# Altium PCB PCB.PcbDoc (part 5 of 7)
Units mm, origin at the board's own origin, x right, y up, seen from the top; angles counter-clockwise.
Board outline 78.8 x 69 mm, 12 copper layers (Top Layer, GND_12, uStrip1, GND_35, Clocks, GND_57, POWER, Slow_Ctrl, GND_810, uStrip2, GND_1012, Bottom Layer), stack 2.926 mm thick; 290 components, 212 nets, 1379 pads, 3418 vias.
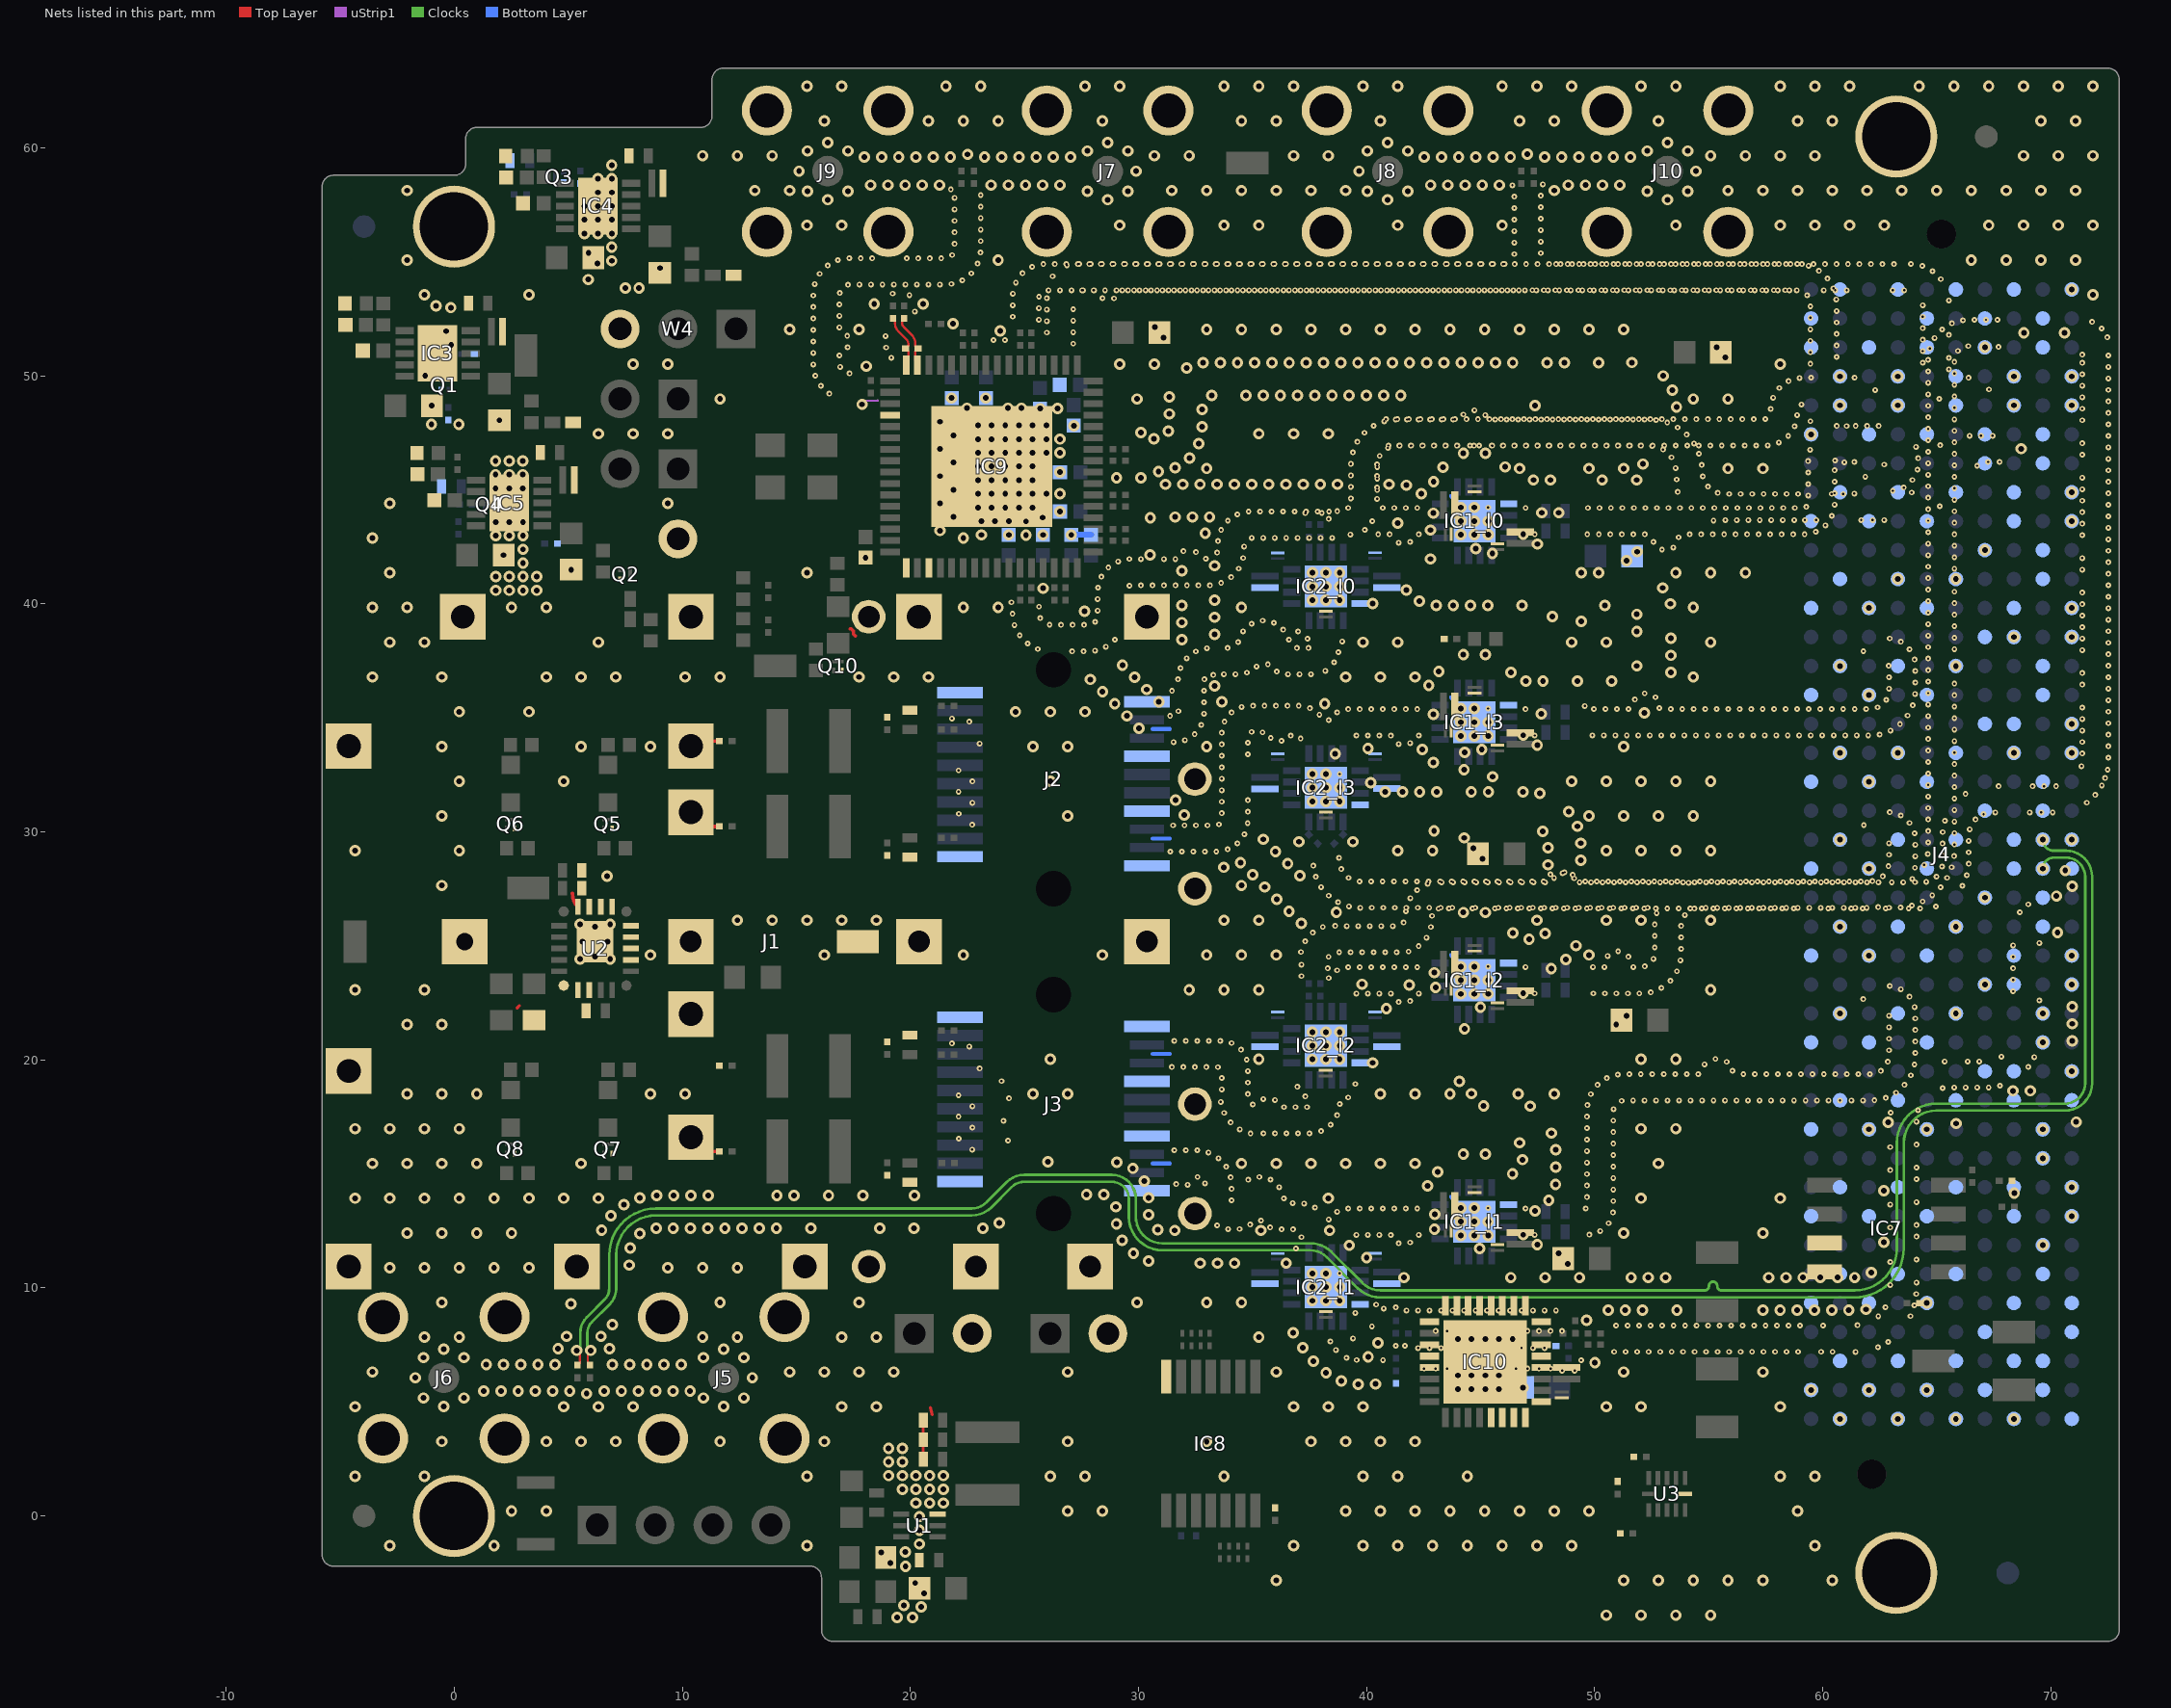
[diagram p14: the nets of this part, all layers, seen from the top]

## Via types
v1: diameter 0.25, hole 0.1, Top Layer to uStrip1, tented both sides, 895 vias
v2: diameter 0.25, hole 0.1, uStrip2 to Bottom Layer, tented both sides, 888 vias
v3: diameter 0.5, hole 0.25, Top Layer to Bottom Layer, tented both sides, 768 vias
v4: diameter 0.5, hole 0.25, Top Layer to Bottom Layer, 545 vias
v5: diameter 0.5, hole 0.25, uStrip1 to uStrip2, tented both sides, 315 vias
v6: diameter 0.584, hole 0.483, Top Layer to Bottom Layer, tented both sides, 6 vias
v7: diameter 0.5, hole 0.25, uStrip1 to uStrip2, 1 vias

## Nets (pads, with @x,y where several pads share a name; then routed paths per layer and width w, separated by ;. In a path a pad name is that pad's centre, name@x,y a point inside that pad or via, vN(x,y) a via of type N, cw(c..) or ccw(c..) an arc to the next point about the centre after c; other vN are vias at no path point) (continued)
GND: C1_l0.1 C1_l1.1 C1_l2.1 C1_l3.1 C2_l0.1 C2_l1.1 C2_l2.1 C2_l3.1 C3_l0.1 C3_l1.1 C3_l2.1 C3_l3.1 C4_l0.1 C4_l1.1 C4_l2.1 C4_l3.1 C5_l0.1 C5_l1.1 C5_l2.1 C5_l3.1 C6_l0.1 C6_l1.1 C6_l2.1 C6_l3.1 C7_l0.1 C7_l1.1 C7_l2.1 C7_l3.1 C8_l0.1 C8_l1.1 C8_l2.1 C8_l3.1 C9_l0.1 C9_l1.1 C9_l2.1 C9_l3.1 C12_l0.1 C12_l1.1 C12_l2.1 C12_l3.1 C13_l0.1 C13_l1.1 C13_l2.1 C13_l3.1 C14.1 C15.1 C16.1 C17.1 C18.1 C19.1 C20.1 C21.2 C23.2 C24.1 C25.1 C26.1 C27.1 C28.1 C30.1 C31.1 C32.1 C33.1 C34.1 C35.1 C36.1 C37.1 C38.1 C39.1 C40.1 C41.1 C42.1 C43.2 C44.2 C45.1 C46.1 C47.1 C48.1 C49.1 C50.1 C51.1 C52.1 C53.1 C54.1 C55.1 C56.1 C65.1 C66.1 C87.1 C88.1 C89.1 C90.1 C93.1 C94.1 C95.1 C96.1 C97.1 C98.1 C99.1 C100.1 C101.1 C102.1 C103.1 C104.1 C105.1 C106.1 C107.1 D1.1 D2.1 IC1_l0.9 IC1_l0.17 IC1_l1.9 IC1_l1.17 IC1_l2.9 IC1_l2.17 IC1_l3.9 IC1_l3.17 IC2_l0.16 IC2_l0.17 IC2_l1.16 IC2_l1.17 IC2_l2.16 IC2_l2.17 IC2_l3.16 IC2_l3.17 IC3.11 IC4.11 IC5.11 IC7.3 IC7.4 IC8.7 IC9.4 IC9.17 IC9.19 IC9.65 IC10.1 IC10.4 IC10.5 IC10.6 IC10.8 IC10.9 IC10.10 IC10.11 IC10.12 IC10.13 IC10.14 IC10.15 IC10.16 IC10.17 IC10.19 IC10.20 IC10.21 IC10.29 IC10.30 IC10.31 IC10.32 IC10.33 J1.1 J1.2 J1.3 J1.4 J1.5 J1.6 J1.7 J1.8 J1.9 J1.10 J1.11 J1.12 J1.13 J1.14 J1.15 J1.16 J1.17 J1.18 J1.19 J1.20 J1.21 J1.22 J1.23 J1.24 J1.25 J1.26 J1.27 J1.28 J1.29 J1.30 J1.31 J1.32 J1.33 J1.34 J1.35 J1.36 J1.37 J2.1 J2.10 J2.11 J2.14 J2.17 J2.20 J3.1 J3.10 J3.11 J3.14 J3.17 J3.20 J4.A1 J4.A4 J4.A5 J4.A8 J4.A9 J4.A12 J4.A13 J4.A16 J4.A17 J4.A20 J4.A21 J4.A24 J4.A25 J4.A28 J4.A29 J4.A32 J4.A33 J4.A36 J4.A37 J4.A40 J4.B2 J4.B3 J4.B6 J4.B7 J4.B10 J4.B11 J4.B14 J4.B15 J4.B18 J4.B19 J4.B22 J4.B23 J4.B26 J4.B27 J4.B30 J4.B31 J4.B34 J4.B35 J4.B38 J4.B39 J4.C1 J4.C4 J4.C5 J4.C8 J4.C9 J4.C12 J4.C13 J4.C16 J4.C17 J4.C20 J4.C21 J4.C24 J4.C25 J4.C28 J4.C29 J4.C32 J4.C33 J4.C36 J4.C38 J4.C40 J4.D2 J4.D3 J4.D6 J4.D7 J4.D10 J4.D13 J4.D16 J4.D19 J4.D22 J4.D25 J4.D28 J4.D37 J4.D39 J4.E1 J4.E4 J4.E5 J4.E8 J4.E11 J4.E14 J4.E17 J4.E20 J4.E23 J4.E26 J4.E29 J4.E32 J4.E35 J4.E38 J4.E40 J4.F2 J4.F3 J4.F6 J4.F9 J4.F12 J4.F15 J4.F18 J4.F21 J4.F24 J4.F27 J4.F30 J4.F33 J4.F36 J4.F39 J4.G1 J4.G4 J4.G5 J4.G8 J4.G11 J4.G14 J4.G17 J4.G20 J4.G23 J4.G26 J4.G29 J4.G32 J4.G35 J4.G38 J4.G40 J4.H3 J4.H6 J4.H9 J4.H12 J4.H15 J4.H18 J4.H21 J4.H24 J4.H27 J4.H30 J4.H33 J4.H36 J4.H39 J4.I1 J4.I4 J4.I5 J4.I8 J4.I11 J4.I14 J4.I17 J4.I20 J4.I23 J4.I26 J4.I29 J4.I32 J4.I35 J4.I38 J4.I40 J4.J2 J4.J3 J4.J6 J4.J9 J4.J12 J4.J15 J4.J18 J4.J21 J4.J24 J4.J27 J4.J30 J4.J33 J4.J36 J4.J39 J5.2 J5.2_1 J5.2_2 J5.2_3 J6.2 J6.2_1 J6.2_2 J6.2_3 J7.2 J7.2_1 J7.2_2 J7.2_3 J8.2 J8.2_1 J8.2_2 J8.2_3 J9.2 J9.2_1 J9.2_2 J9.2_3 J10.2 J10.2_1 J10.2_2 J10.2_3 pad.frame-holes Q1.2 Q2.2 Q3.2 Q4.2 Q5.2 Q6.2 Q7.2 Q8.2 Q10.2 R4.2 R6.1 R10.1 R12.1 R16.1 R19.1 R23.1 R24.2 R27.2 R46.1 R47.1 R65X.1 R66X.1 TP5.1 U1.3 U2.3 U2.4 U2.5 U2.6 U2.8 U2.9 U2.10 U2.11 U2.18 U2.19 U2.20 U2.23 U3.6 W1.2 W2.2 W4.3 W7.1 | length 12.2
  Top Layer w0.102: 2.756,22.261 2.756,22.306
  Top Layer w0.127: 2.756,22.287 2.847,22.378 ; J1.11@10.371,33.765 J1.11@10.598,33.992 ; C23.2@20.56,2.489 C24.1@20.56,3.343 C25.1@20.56,4.197 ; 20.873,4.753 20.958,4.434
  Top Layer w0.152: 5.176,27.308 ccw(c6.015,27.308) 5.197,27.12 ccw(c5.346,27.155) 5.207,27.092 cw(c5.047,27.015) 5.223,27.041 ccw(c5.373,27.064) 5.23,27.013 ccw(c6.015,27.308) 5.373,26.768 U2.11@5.422,26.715 ; J1.7@10.598,15.99 C56.1@11.628,15.99 ; J1.10@10.598,30.238 C50.1@11.628,30.238 ; J1.11@10.598,33.992 C47.1@11.628,33.992 ; 17.368,38.906 17.395,38.906 17.499,38.802 17.499,38.676 17.588,38.588
  uStrip1 w0.102: v3(17.881,48.754) v3@17.957,48.83 ; v3@17.964,48.912 18.553,48.918
  Bottom Layer w0.102: 43.676,14.032 ccw(c43.828,14.032) 43.713,13.931 43.791,13.843 ; 43.676,24.622 ccw(c43.828,24.622) 43.713,24.521 43.791,24.433 ; 43.676,35.936 ccw(c43.828,35.936) 43.713,35.835 43.791,35.747 ; 43.677,44.759 ccw(c43.829,44.759) 43.715,44.658 43.792,44.57
  Bottom Layer w0.178: 30.626,15.465 31.377,15.465 ; 30.626,20.265 31.377,20.265 ; 30.626,29.715 31.377,29.715 ; 30.626,34.515 31.377,34.515
  Bottom Layer w0.254: C88.1@27.053,43.03 C100.1@27.92,43.03
  other v1: 49.765,12.339 50.244,12.496 50.611,12.842 50.798,13.31 49.61,13.487 50.818,13.813 49.661,13.989 50.818,14.317 49.661,14.493 50.818,14.821 49.661,14.997 50.818,15.325 49.661,15.501 50.818,15.829 49.661,16.005 22.705,16.069 50.818,16.333 24.278,16.465 49.661,16.509 22.118,16.551 50.818,16.837 49.661,17.013 22.714,17.033 24.078,17.328 50.818,17.341 22.109,17.515 49.661,17.517 50.83,17.845 22.714,17.969 49.682,18.02 51.181,18.207 51.685,18.221 52.189,18.221 52.693,18.221 53.197,18.221 53.701,18.221 54.205,18.221 54.709,18.221 55.213,18.221 55.717,18.221 56.221,18.221 56.725,18.221 57.229,18.221 57.733,18.221 58.237,18.221 58.741,18.221 59.245,18.221 59.749,18.221 60.253,18.221 60.757,18.221 61.261,18.221 61.765,18.221 62.269,18.232 24.32,18.316 62.761,18.338 22.109,18.452 49.83,18.502 63.211,18.565 50.125,18.911 63.583,18.906 23.994,19.073 50.533,19.207 63.86,19.327 51.014,19.356 51.518,19.378 52.022,19.378 52.526,19.378 53.03,19.378 53.534,19.378 54.038,19.378 54.542,19.378 56.522,19.378 57.026,19.378 57.53,19.378 58.034,19.378 58.538,19.378 59.042,19.378 59.546,19.378 60.05,19.378 60.554,19.378 61.058,19.378 61.562,19.378 62.066,19.378 56.04,19.526 62.548,19.524 23.035,19.63 54.814,19.81 64.022,19.804 55.789,19.919 62.853,19.925 55.297,20.044 64.06,20.307 62.903,20.427 22.577,20.589 21.82,20.727 64.06,20.811 62.903,20.931 64.06,21.315 62.903,21.435 64.06,21.819 62.903,21.939 64.025,22.321 61.778,22.67 63.803,22.774 49.942,22.919 50.446,22.919 50.95,22.919 51.454,22.919 51.958,22.919 52.46,22.967 63.423,23.104 52.926,23.159 62.939,23.247 53.32,23.474 53.604,23.89 49.924,24.076 50.428,24.076 51.692,24.076 52.195,24.103 53.76,24.369 52.574,24.436 51.476,24.531 50.569,24.56 51.029,24.765 53.789,24.872 52.633,24.937 53.789,25.376 52.633,25.441 53.79,25.88 52.633,25.945 53.955,26.357 52.717,26.442 54.37,26.643 39.723,26.674 54.873,26.672 55.377,26.672 55.881,26.672 56.385,26.672 56.889,26.672 57.393,26.672 57.897,26.672 58.401,26.672 58.905,26.672 59.409,26.672 59.913,26.672 60.417,26.672 60.921,26.672 61.425,26.672 61.929,26.672 40.227,26.678 40.731,26.678 41.235,26.678 41.739,26.678 42.243,26.678 42.747,26.678 43.251,26.678 43.755,26.678 44.763,26.678 45.771,26.678 46.275,26.678 46.779,26.678 47.283,26.678 47.787,26.678 48.291,26.678 48.795,26.678 49.299,26.678 49.803,26.678 50.307,26.678 50.811,26.678 51.315,26.678 51.819,26.678 52.323,26.678 62.907,26.678 63.411,26.687 62.432,26.705 39.223,26.74 63.908,26.772 38.753,26.921 64.378,26.953 38.338,27.207 64.803,27.224 38.003,27.584 65.166,27.574 54.115,27.773 39.691,27.832 40.195,27.827 40.699,27.827 41.203,27.827 41.707,27.827 42.211,27.827 42.715,27.827 43.219,27.827 43.723,27.827 44.227,27.827 44.731,27.827 45.235,27.827 45.739,27.827 46.243,27.827 46.747,27.827 47.251,27.827 47.755,27.827 49.588,27.827 50.092,27.827 50.596,27.827 51.1,27.827 51.604,27.827 52.108,27.827 52.612,27.827 53.116,27.827 53.62,27.827 54.616,27.829 55.12,27.829 55.624,27.829 56.128,27.829 56.632,27.829 57.136,27.829 57.64,27.829 58.144,27.829 58.648,27.829 59.152,27.829 59.656,27.829 60.16,27.829 60.664,27.829 61.168,27.829 61.672,27.829 62.176,27.845 63.925,27.941 49.104,27.967 39.211,27.987 65.453,27.988 37.773,28.032 62.633,28.057 48.063,28.143 48.676,28.233 38.885,28.37 64.042,28.431 65.652,28.451 62.879,28.497 37.66,28.523 64.448,28.555 38.792,28.866 64.06,28.935 65.755,28.945 62.903,29 64.604,29.034 64.06,29.439 65.773,29.448 62.903,29.504 64.624,29.538 64.025,29.941 65.773,29.952 64.624,30.042 61.803,30.301 22.705,30.317 63.803,30.394 65.773,30.456 64.624,30.546 63.423,30.724 22.119,30.799 62.939,30.867 65.773,30.96 64.624,31.05 22.714,31.281 65.773,31.464 64.624,31.554 22.109,31.763 65.773,31.968 64.624,32.058 22.714,32.217 65.773,32.472 64.624,32.562 22.109,32.699 65.773,32.976 64.624,33.066 65.773,33.48 64.624,33.57 23.035,33.878 65.773,33.984 64.624,34.074 49.897,34.233 50.401,34.233 50.905,34.233 51.409,34.233 51.913,34.233 52.417,34.233 52.921,34.233 53.425,34.233 53.929,34.233 54.433,34.233 54.937,34.233 55.441,34.233 55.945,34.233 56.449,34.233 56.953,34.233 57.457,34.233 57.961,34.233 58.465,34.233 58.969,34.233 59.473,34.233 59.977,34.233 60.481,34.233 60.985,34.233 61.489,34.233 61.993,34.233 62.495,34.275 62.969,34.448 65.773,34.488 64.624,34.578 63.387,34.729 22.577,34.836 21.82,34.975 65.773,34.992 64.624,35.082 63.721,35.106 49.97,35.39 50.474,35.39 50.978,35.39 51.482,35.39 53.335,35.39 53.839,35.39 54.343,35.39 54.847,35.39 55.351,35.39 55.855,35.39 56.359,35.39 56.863,35.39 57.367,35.39 57.871,35.39 58.375,35.39 58.879,35.39 59.383,35.39 59.887,35.39 60.391,35.39 60.895,35.39 61.399,35.39 61.903,35.39 52.833,35.433 62.402,35.464 65.773,35.496 49.568,35.526 63.946,35.557 64.624,35.586 62.784,35.792 51.765,35.806 52.663,35.908 65.773,36 64.049,36.051 52.189,36.079 64.624,36.09 62.903,36.282 65.773,36.504 64.06,36.555 64.624,36.594 62.903,36.786 64.06,37.059 64.624,37.098 62.892,37.29 64.025,37.561 64.624,37.602 27.087,37.924 27.591,37.924 61.78,37.926 28.094,37.952 25.585,38.022 63.803,38.014 65.773,38.016 28.569,38.121 64.624,38.106 25.142,38.264 63.423,38.344 28.963,38.435 62.939,38.487 65.773,38.52 64.624,38.61 24.791,38.624 65.773,39.024 24.561,39.073 26.101,39.09 26.605,39.08 27.109,39.08 27.613,39.08 64.624,39.114 28.099,39.216 25.69,39.381 65.773,39.528 24.476,39.57 64.624,39.618 28.209,39.708 25.637,39.882 65.773,40.032 24.426,40.071 64.624,40.122 28.209,40.212 65.773,40.536 64.624,40.626 28.225,40.716 29.603,40.802 30.107,40.813 30.611,40.813 31.115,40.813 31.619,40.813 32.123,40.813 32.627,40.813 33.131,40.813 33.623,40.922 64.624,41.13 34.059,41.176 28.37,41.198 34.395,41.551 65.773,41.544 28.678,41.597 64.624,41.634 29.107,41.861 29.599,41.972 30.103,41.97 31.111,41.97 31.615,41.97 32.949,41.983 34.591,42.015 65.773,42.048 64.624,42.138 33.446,42.255 32.517,42.275 31.972,42.312 52.95,42.384 53.445,42.477 34.632,42.518 65.773,42.552 64.624,42.642 52.575,42.721 33.486,42.757 34.962,42.899 35.466,42.899 35.97,42.899 36.474,42.899 36.978,42.899 37.482,42.899 37.986,42.899 38.49,42.899 53.678,42.924 49.678,43.056 50.182,43.056 50.686,43.056 51.19,43.056 51.694,43.056 52.198,43.056 54.165,43.056 54.669,43.056 55.173,43.056 55.677,43.056 56.181,43.056 56.685,43.056 57.189,43.056 57.693,43.056 58.197,43.056 58.701,43.056 59.205,43.055 65.773,43.056 64.624,43.146 59.696,43.169 33.622,43.242 39.923,43.251 60.116,43.447 65.773,43.56 40.252,43.632 33.916,43.652 64.624,43.65 60.4,43.863 34.337,43.929 34.826,44.051 35.33,44.055 35.834,44.055 36.338,44.055 36.842,44.055 37.346,44.055 37.85,44.055 38.354,44.055 65.773,44.064 64.624,44.154 49.703,44.213 50.207,44.213 50.711,44.213 51.215,44.213 51.719,44.213 52.223,44.213 52.727,44.213 53.231,44.213 53.735,44.213 54.239,44.213 54.743,44.213 55.247,44.213 55.751,44.213 56.255,44.213 56.759,44.213 57.263,44.213 57.767,44.213 58.271,44.213 58.775,44.213 59.277,44.258 60.52,44.353 65.773,44.568 40.46,44.607 39.304,44.625 64.624,44.658 59.363,44.754 60.52,44.857 63.07,44.963 65.773,45.072 40.46,45.111 63.553,45.105 39.304,45.129 64.624,45.162 59.363,45.258 60.52,45.361 63.933,45.437 61.864,45.578 65.773,45.576 40.46,45.615 39.304,45.633 64.624,45.666 59.363,45.762 60.52,45.865 64.151,45.891 65.773,46.08 40.46,46.119 62.697,46.113 39.304,46.137 64.624,46.17 60.945,46.215 61.384,46.231 59.358,46.266 60.542,46.292 64.185,46.394 65.773,46.584 64.624,46.674 59.448,46.762 64.086,46.888 40.955,46.949 41.459,46.949 41.963,46.949 42.467,46.949 42.971,46.949 43.475,46.949 43.979,46.949 44.534,46.949 44.936,46.949 45.491,46.949 45.995,46.949 46.499,46.949 47.003,46.949 47.507,46.949 48.011,46.949 48.515,46.949 49.019,46.949 49.523,46.949 50.027,46.949 50.531,46.949 51.035,46.949 51.539,46.949 52.043,46.949 52.547,46.949 53.051,46.949 53.555,46.949 54.059,46.949 54.563,46.949 55.067,46.949 55.571,46.949 56.075,46.949 56.579,46.949 57.083,46.949 57.587,46.953 58.075,47.08 65.773,47.088 64.624,47.178 58.487,47.369 65.773,47.592 64.624,47.682 58.762,47.792 61.044,47.802 61.444,47.805 61.948,47.805 62.452,47.805 60.612,47.808 59.459,48.013 40.85,48.106 41.354,48.106 41.858,48.106 42.362,48.106 42.866,48.106 43.37,48.106 43.874,48.106 44.378,48.106 44.882,48.106 45.386,48.106 45.89,48.106 46.394,48.106 46.898,48.106 47.402,48.106 47.906,48.106 48.41,48.106 48.914,48.106 49.418,48.106 49.922,48.106 50.426,48.106 50.93,48.106 51.434,48.106 51.938,48.106 52.442,48.106 52.946,48.106 53.45,48.106 53.954,48.106 54.458,48.106 54.962,48.106 55.466,48.106 55.97,48.106 56.474,48.106 56.978,48.106 57.482,48.108 65.773,48.096 64.624,48.186 58.878,48.282 57.718,48.553 65.773,48.6 64.624,48.69 59.066,48.75 57.829,49.045 65.773,49.104 64.624,49.194 16.441,49.221 62.3,49.383 58.095,49.473 16.074,49.566 65.773,49.608 64.624,49.698 58.5,49.773 58.984,49.912 59.488,49.923 61.395,49.928 15.831,50.008 17.332,50.109 65.773,50.112 64.624,50.202 16.919,50.397 15.738,50.503 59.459,50.533 65.773,50.616 64.618,50.706 19.164,50.797 60.608,50.832 16.889,50.9 15.74,51.007 59.459,51.037 65.924,51.097 64.689,51.204 17.247,51.255 18.935,51.246 67.709,51.273 66.381,51.308 60.608,51.336 27.137,51.416 15.74,51.511 59.459,51.541 23.638,51.572 24.142,51.572 64.901,51.662 17.231,51.759 18.906,51.749 60.608,51.84 25.98,51.901 27.137,51.92 15.74,52.015 59.459,52.045 65.235,52.039 16.889,52.129 65.663,52.306 60.608,52.344 25.98,52.405 27.137,52.424 66.148,52.441 66.652,52.459 67.156,52.459 67.66,52.459 15.74,52.519 59.459,52.549 16.889,52.633 20.188,52.828 60.608,52.848 25.98,52.909 27.137,52.928 15.74,53.023 59.459,53.053 16.889,53.137 60.594,53.352 25.98,53.413 15.74,53.527 19.954,53.541 59.315,53.536 19.219,53.611 16.902,53.641 27.524,53.755 28.028,53.755 28.532,53.755 29.036,53.755 29.54,53.755 30.044,53.755 30.548,53.755 31.052,53.755 31.556,53.755 32.06,53.755 32.564,53.755 33.068,53.755 33.572,53.755 34.076,53.755 34.58,53.755 35.084,53.755 35.588,53.755 36.092,53.755 36.596,53.755 37.1,53.755 37.604,53.755 38.108,53.755 38.612,53.755 39.116,53.755 39.62,53.755 40.124,53.755 40.628,53.755 41.132,53.755 41.636,53.755 42.14,53.755 42.644,53.755 43.148,53.755 43.652,53.755 44.156,53.755 44.66,53.755 45.164,53.755 45.668,53.755 46.172,53.755 46.676,53.755 47.269,53.759 47.773,53.759 48.277,53.759 48.781,53.759 49.285,53.759 49.789,53.759 50.293,53.759 50.797,53.759 51.301,53.759 51.805,53.759 52.309,53.759 52.813,53.759 53.317,53.759 53.821,53.759 54.325,53.759 54.829,53.759 55.333,53.759 55.837,53.759 56.341,53.759 56.845,53.759 57.349,53.759 57.853,53.759 58.357,53.759 58.861,53.755 60.466,53.84 17.259,53.996 15.8,54.027 17.763,54.009 18.267,54.009 18.771,54.009 19.275,54.009 19.779,54.009 20.283,54.009 20.787,54.009 21.291,54.009 21.794,54.033 22.273,54.191 60.205,54.271 26.231,54.371 16.023,54.48 22.671,54.501 59.833,54.611 16.374,54.841 59.38,54.832 26.863,54.847 27.397,54.912 27.901,54.912 28.405,54.912 28.909,54.912 29.413,54.912 29.917,54.912 30.421,54.912 30.925,54.912 31.429,54.912 31.933,54.912 32.437,54.912 32.941,54.912 33.445,54.912 33.949,54.912 34.453,54.912 34.957,54.912 35.461,54.912 35.965,54.912 36.469,54.912 36.973,54.912 37.477,54.912 37.981,54.912 38.485,54.912 38.989,54.912 39.493,54.912 39.997,54.912 40.501,54.912 41.005,54.912 41.509,54.912 42.013,54.912 42.517,54.912 43.021,54.912 43.525,54.912 44.029,54.912 44.533,54.912 45.037,54.912 45.541,54.912 46.045,54.912 48.309,54.907 48.813,54.907 49.317,54.907 49.821,54.907 50.325,54.907 50.829,54.907 51.333,54.907 51.837,54.907 52.341,54.907 52.845,54.907 53.349,54.907 53.853,54.907 54.357,54.907 54.861,54.907 55.365,54.907 55.869,54.907 56.373,54.907 56.877,54.907 57.381,54.907 57.885,54.907 58.389,54.907 58.882,54.911 22.944,54.924 16.819,55.078 17.315,55.164 17.819,55.157 18.323,55.157 19.835,55.157 20.339,55.157 20.843,55.157 21.347,55.157 21.831,55.301 46.479,55.345 47.635,55.387 23.072,55.412 21.933,55.794 46.479,55.849 47.635,55.891 23.081,55.916 21.933,56.298 46.479,56.353 47.635,56.395 23.081,56.42 21.933,56.802 46.479,56.857 47.635,56.899 23.081,56.924 21.933,57.306 46.479,57.361 47.635,57.403 23.081,57.428 21.933,57.81 46.479,57.865 47.635,57.907 23.081,57.932 21.769,58.178 46.395,58.362 47.728,58.402
  other v2: 48.576,6.373 49.122,6.371 42.521,6.465 43.025,6.465 43.529,6.465 46.553,6.465 47.057,6.465 47.561,6.465 48.065,6.465 40.72,6.835 49.409,6.83 39.565,6.841 39.117,6.937 50.854,7.202 51.358,7.202 51.862,7.202 52.366,7.202 52.87,7.202 53.374,7.202 53.878,7.202 54.382,7.202 54.886,7.202 55.39,7.202 55.894,7.202 56.398,7.202 56.902,7.202 57.406,7.202 57.91,7.202 58.414,7.202 58.918,7.202 59.926,7.202 60.43,7.202 61.438,7.198 38.655,7.278 42.255,7.364 42.759,7.364 43.263,7.364 46.791,7.364 47.295,7.364 47.799,7.364 62.42,7.403 41.282,7.464 41.679,7.464 62.868,7.635 38.414,7.652 39.403,7.787 43.025,8.113 43.529,8.113 47.057,8.113 47.561,8.113 48.065,8.113 48.569,8.113 40.234,8.315 50.94,8.351 51.444,8.351 51.948,8.351 52.452,8.351 52.956,8.351 53.46,8.351 53.964,8.351 54.468,8.351 54.972,8.351 55.476,8.351 55.98,8.351 56.484,8.351 56.988,8.351 57.492,8.351 57.996,8.351 58.5,8.351 59.004,8.351 60.012,8.351 61.524,8.366 62.435,8.762 63.847,8.764 39.506,8.909 41.751,9.012 42.255,9.012 42.759,9.012 43.263,9.012 43.767,9.012 44.271,9.012 44.775,9.012 45.279,9.012 45.783,9.012 46.287,9.012 46.791,9.012 47.295,9.012 47.799,9.012 48.303,9.012 40.751,9.096 41.282,9.151 62.749,9.157 64.018,9.239 40.419,9.271 64.098,9.736 62.959,10.131 64.108,10.24 38.818,10.639 62.959,11.139 64.108,11.248 36.9,11.73 41.405,11.957 41.908,11.996 37.143,12.23 64.108,12.256 39.55,12.328 40.054,12.328 40.558,12.328 41.062,12.326 42.286,12.328 47.372,12.328 36.271,12.573 36.775,12.573 33.927,12.583 34.431,12.589 62.959,12.651 35.774,12.658 33.449,12.744 64.108,12.76 34.896,12.784 35.369,12.958 38.337,13.006 38.71,13.345 39.195,13.484 39.699,13.485 40.203,13.485 40.707,13.485 41.211,13.485 41.715,13.485 42.219,13.485 46.97,13.485 45.328,13.507 37.735,13.528 62.959,13.659 37.262,13.704 36.759,13.722 64.108,13.768 34.079,13.844 36.372,13.93 34.079,14.348 36.167,14.422 32.155,14.527 31.652,14.558 32.912,14.59 34.809,14.745 35.789,14.755 64.108,14.776 34.041,14.851 32.586,14.871 35.298,14.869 62.959,15.171 64.108,15.28 33.846,15.315 33.507,15.689 33.07,15.94 31.569,16.039 32.073,16.039 32.577,16.043 62.959,16.179 64.108,16.288 34.911,16.774 35.479,16.782 35.983,16.782 36.487,16.782 36.991,16.782 37.495,16.781 38.006,16.879 34.439,16.953 38.425,17.159 34.041,17.261 64.108,17.296 38.706,17.577 33.756,17.677 62.982,17.69 64.181,17.795 36.376,17.931 36.88,17.931 37.384,17.931 35.011,18.051 38.822,18.068 33.605,18.158 35.982,18.245 35.473,18.286 39.195,18.355 37.311,18.404 34.794,18.505 33.645,18.706 65.258,18.765 65.761,18.793 66.265,18.793 66.769,18.793 67.273,18.795 36.964,18.825 67.771,18.873 39.505,18.947 34.794,19.009 33.645,19.21 34.794,19.513 33.476,19.685 31.46,19.691 31.964,19.691 32.468,19.691 32.972,19.691 69.011,19.696 65.349,19.933 66.357,19.933 66.861,19.933 34.742,20.015 69.275,20.125 67.834,20.148 34.492,20.452 34.079,20.742 31.569,20.839 32.073,20.839 32.577,20.839 33.081,20.839 33.585,20.839 41.405,22.543 41.908,22.582 69.496,22.614 39.55,22.915 40.054,22.915 40.558,22.915 41.062,22.913 42.286,22.915 47.372,22.918 68.347,23.012 68.347,23.516 38.337,23.592 37.146,23.679 38.71,23.931 38.295,24.022 68.347,24.02 39.195,24.071 39.699,24.072 40.203,24.072 40.707,24.072 41.211,24.072 41.715,24.072 42.219,24.072 46.97,24.075 45.328,24.097 37.146,24.183 38.333,24.525 68.347,24.524 37.127,24.734 38.796,24.724 39.3,24.724 39.804,24.724 40.308,24.724 40.812,24.724 41.316,24.724 41.839,24.756 42.283,24.996 68.347,25.028 69.496,25.134 37.308,25.205 42.626,25.365 37.642,25.582 38.08,25.831 42.816,25.832 38.625,25.877 39.129,25.872 39.633,25.872 40.137,25.872 40.641,25.872 41.145,25.872 41.625,26.026 42.87,26.319 68.644,26.478 41.721,26.52 43.151,26.635 43.607,26.644 44.647,26.645 45.623,26.644 46.127,26.644 46.631,26.644 47.135,26.644 47.639,26.644 48.143,26.644 48.647,26.644 49.151,26.644 49.655,26.644 50.159,26.644 50.663,26.644 51.167,26.644 51.671,26.644 52.175,26.644 52.679,26.644 53.183,26.644 53.687,26.644 54.191,26.644 54.695,26.644 55.199,26.644 55.703,26.644 56.207,26.644 56.711,26.644 57.215,26.644 57.719,26.644 58.223,26.644 58.727,26.644 60.239,26.644 61.247,26.644 61.751,26.644 62.759,26.644 63.767,26.644 64.271,26.644 64.961,26.729 69.01,26.825 41.919,27.098 42.217,27.449 66.125,27.642 42.677,27.729 43.29,27.792 43.794,27.792 44.298,27.792 44.802,27.792 45.306,27.792 45.81,27.792 46.314,27.792 46.818,27.792 47.322,27.792 47.826,27.792 49.338,27.792 49.842,27.792 50.346,27.792 50.85,27.792 51.354,27.792 51.858,27.792 52.362,27.792 52.866,27.792 53.37,27.792 53.874,27.792 54.378,27.792 54.882,27.792 55.386,27.792 55.89,27.792 56.394,27.792 56.898,27.792 57.402,27.792 57.906,27.792 58.41,27.792 58.914,27.792 59.418,27.792 59.922,27.792 60.426,27.792 60.93,27.792 61.434,27.792 61.938,27.792 62.442,27.792 63.027,27.792 63.531,27.792 64.048,27.797 64.539,27.813 48.219,27.98 64.99,28.038 49.036,28.118 66.32,28.106 48.596,28.194 65.227,28.483 66.4,28.604 65.25,28.986 66.399,29.108 33.412,29.137 31.396,29.141 31.9,29.141 32.404,29.141 32.908,29.141 33.906,29.239 65.25,29.49 34.337,29.5 66.399,29.612 34.643,29.9 65.26,29.994 66.444,30.114 31.511,30.289 32.015,30.289 32.519,30.289 33.023,30.289 33.526,30.333 34.782,30.385 65.358,30.488 66.699,30.549 67.054,30.783 33.645,30.823 67.563,30.858 69.075,30.858 69.579,30.858 70.083,30.858 34.794,30.889 71.577,31.285 33.645,31.327 34.794,31.393 71.949,31.624 66.261,31.667 33.645,31.831 67.713,32.007 69.198,32.007 69.702,32.007 70.233,32.007 72.239,32.037 33.645,32.335 72.381,32.367 38.818,32.54 72.491,32.729 33.645,32.839 71.344,32.883 72.525,33.258 33.645,33.343 34.794,33.409 71.376,33.442 72.525,33.762 33.645,33.847 41.407,33.857 34.794,33.913 41.909,33.897 31.533,33.941 71.376,33.946 36.265,33.998 32.03,34.025 37.107,34.1 35.799,34.123 36.675,34.223 39.55,34.229 40.054,34.229 40.558,34.229 41.064,34.227 42.288,34.229 47.372,34.232 72.525,34.266 32.461,34.285 33.645,34.351 35.438,34.367 34.96,34.388 71.376,34.45 32.753,34.696 72.525,34.77 33.771,34.839 38.337,34.906 71.376,34.954 31.384,35.089 37.93,35.142 32.874,35.185 34.079,35.237 38.71,35.245 72.525,35.274 31.744,35.297 39.195,35.385 39.699,35.386 40.203,35.386 40.707,35.386 41.211,35.386 41.715,35.386 42.219,35.386 45.328,35.411 46.97,35.389 37.514,35.426 71.376,35.458 34.519,35.484 35.02,35.537 35.524,35.537 36.028,35.537 36.532,35.537 37.022,35.537 32.873,35.689 72.525,35.778 31.467,36.187 32.873,36.193 72.525,36.282 71.376,36.466 31.729,36.698 32.89,36.697 72.525,36.786 33.279,36.886 33.746,36.921 34.25,36.921 36.554,36.92 37.058,36.921 37.562,36.921 34.75,36.985 71.376,36.97 36.063,37.032 38.191,37.067 31.842,37.189 35.175,37.256 72.525,37.29 35.67,37.348 38.577,37.441 32.111,37.615 72.525,37.794 38.76,37.887 32.515,37.916 71.376,37.978 32.999,38.058 33.908,38.069 36.945,38.069 37.449,38.069 72.525,38.298 34.365,38.33 38.928,38.357 36.595,38.433 37.411,38.477 71.376,38.482 34.581,38.797 37,38.792 72.525,38.802 36.34,38.871 71.376,38.986 34.956,39.133 35.936,39.173 35.441,39.27 72.525,39.306 71.376,39.49 72.525,39.81 71.376,39.994 72.525,40.314 71.376,40.498 72.525,40.818 72.525,41.322 71.376,41.506 72.525,41.826 71.376,42.01 72.525,42.33 41.407,42.684 41.909,42.723 72.525,42.834 71.376,43.018 39.288,43.044 40.509,43.055 41.013,43.053 42.288,43.055 47.373,43.055 72.525,43.338 71.376,43.522 55.213,43.659 55.727,43.677 56.231,43.677 56.735,43.677 57.239,43.677 57.743,43.677 58.247,43.677 58.751,43.677 59.214,43.677 59.718,43.677 61.684,43.677 62.188,43.677 62.692,43.677 38.339,43.733 72.525,43.842 37.315,43.984 38.036,43.99 71.376,44.026 38.712,44.072 39.196,44.211 40.708,44.212 41.212,44.212 41.716,44.212 42.22,44.212 46.971,44.212 45.329,44.234 65.13,44.284 72.525,44.346 71.376,44.53 39.317,44.636 55.897,44.825 56.401,44.825 56.905,44.825 57.409,44.825 57.913,44.825 58.417,44.825 58.921,44.825 60.394,44.825 60.898,44.825 61.382,44.843 72.525,44.85 55.396,44.873 63.897,44.886 53.644,44.915 40.466,44.993 71.376,45.034 39.317,45.14 54.971,45.145 72.525,45.354 53.596,45.459 40.466,45.497 71.376,45.538 54.745,45.595 39.317,45.644 72.525,45.858 53.55,45.96 40.466,46.001 66.766,46.06 54.696,46.097 39.317,46.148 67.249,46.231 67.753,46.231 72.525,46.362 53.368,46.431 40.573,46.494 71.376,46.546 54.576,46.586 39.399,46.645 52.998,46.773 40.936,46.843 72.525,46.866 41.431,46.94 41.935,46.94 42.439,46.94 42.943,46.94 43.447,46.94 43.951,46.94 44.709,46.94 45.513,46.94 45.967,46.94 46.471,46.94 46.975,46.94 47.479,46.94 47.983,46.94 48.487,46.94 48.991,46.94 49.495,46.94 49.999,46.94 50.503,46.94 51.007,46.94 51.511,46.94 52.015,46.94 52.518,46.927 65.153,46.964 54.353,47.039 71.376,47.05 39.598,47.108 72.525,47.37 66.438,47.378 66.942,47.378 67.446,47.378 54.033,47.428 39.906,47.507 53.637,47.74 40.307,47.813 72.525,47.874 53.182,47.956 40.771,48.009 71.376,48.058 52.691,48.069 41.268,48.09 41.772,48.089 42.276,48.089 42.78,48.089 43.284,48.089 43.788,48.089 45.635,48.089 46.139,48.089 46.643,48.089 47.147,48.089 47.651,48.089 48.155,48.089 48.659,48.089 49.163,48.089 49.667,48.089 50.171,48.089 50.675,48.089 51.179,48.089 51.683,48.089 52.187,48.089 45.201,48.281 44.24,48.312 72.525,48.378 44.727,48.495 71.376,48.562 72.525,48.882 65.106,48.998 71.376,49.066 72.525,49.386 67.289,49.409 71.376,49.57 72.525,49.89 66.393,49.919 71.376,50.074 65.53,50.29 72.525,50.394 64.383,50.581 71.376,50.578 65.53,50.794 72.525,50.898 71.378,50.936 64.383,51.085 64.383,51.589 72.474,51.694 65.53,51.802 64.383,52.093 72.225,52.082 71.81,52.368 25.633,52.468 24.484,52.599 64.383,52.597 25.633,52.972 24.484,53.103 64.383,53.101 65.53,53.314 28.422,53.41 28.926,53.399 25.635,53.476 24.492,53.607 26.053,53.757 26.557,53.757 27.061,53.757 27.565,53.757 28.053,53.754 29.284,53.754 29.804,53.757 30.308,53.757 30.812,53.757 31.316,53.757 31.82,53.757 32.324,53.757 32.828,53.757 33.332,53.757 33.836,53.757 34.34,53.757 34.844,53.757 35.348,53.757 35.852,53.757 36.356,53.757 36.86,53.757 37.364,53.757 37.868,53.757 38.372,53.757 38.876,53.757 39.38,53.757 39.884,53.757 40.388,53.757 40.892,53.757 41.396,53.757 41.9,53.757 42.404,53.757 42.908,53.757 43.412,53.757 43.916,53.757 44.42,53.757 44.924,53.757 45.428,53.757 45.932,53.757 46.436,53.757 46.94,53.757 47.444,53.757 47.948,53.757 48.452,53.757 48.956,53.757 49.46,53.757 49.964,53.757 50.468,53.757 50.972,53.757 51.476,53.757 51.98,53.757 52.484,53.757 52.988,53.757 53.492,53.757 53.996,53.757 54.5,53.757 55.004,53.757 55.508,53.757 56.012,53.757 56.516,53.757 57.02,53.757 57.524,53.757 58.028,53.757 58.532,53.757 60.044,53.757 60.548,53.757 61.052,53.757 63.068,53.757 63.572,53.757 24.624,54.094 65.177,54.247 24.915,54.505 64.814,54.597 25.336,54.782 64.365,54.825 25.825,54.903 26.329,54.906 26.833,54.906 27.337,54.906 27.841,54.906 28.345,54.906 28.849,54.906 29.353,54.906 29.857,54.906 30.361,54.906 30.865,54.906 31.369,54.906 31.873,54.906 32.377,54.906 32.881,54.906 33.385,54.906 33.889,54.906 34.393,54.906 34.897,54.906 35.401,54.906 35.905,54.906 36.409,54.906 36.913,54.906 37.417,54.906 37.921,54.906 38.425,54.906 38.929,54.906 39.433,54.906 39.937,54.906 40.441,54.906 40.945,54.906 41.449,54.906 41.953,54.906 42.457,54.906 42.961,54.906 43.465,54.906 43.969,54.906 44.473,54.906 44.977,54.906 45.481,54.906 45.985,54.906 46.489,54.906 46.993,54.906 47.497,54.906 48.001,54.906 48.505,54.906 49.009,54.906 49.513,54.906 50.017,54.906 50.521,54.906 51.025,54.906 51.529,54.906 52.033,54.906 52.537,54.906 53.041,54.906 53.545,54.906 54.049,54.906 54.553,54.906 55.057,54.906 55.561,54.906 56.065,54.906 56.569,54.906 57.073,54.906 57.577,54.906 58.081,54.906 58.585,54.906 59.089,54.906 59.593,54.906 60.097,54.906 60.601,54.906 61.105,54.906 61.609,54.906 62.113,54.906 62.617,54.906 63.121,54.906 63.868,54.909
  other v3: 19.414,-4.457 20.088,-4.457 50.513,-4.351 52.037,-4.351 53.561,-4.351 55.085,-4.351 20.478,-3.986 19.71,-3.924 36.035,-2.827 51.275,-2.827 52.799,-2.827 54.323,-2.827 55.847,-2.827 57.371,-2.827 60.419,-2.827 -2.827,-1.303 1.745,-1.303 15.461,-1.303 36.797,-1.303 39.845,-1.303 41.369,-1.303 42.893,-1.303 44.417,-1.303 45.941,-1.303 47.465,-1.303 48.989,-1.303 59.657,-1.303 2.507,0.221 4.031,0.221 26.891,0.221 28.415,0.221 39.083,0.221 40.607,0.221 42.131,0.221 43.655,0.221 45.179,0.221 46.703,0.221 48.227,0.221 49.751,0.221 58.895,0.221 -4.351,1.745 -1.303,1.745 15.461,1.745 26.129,1.745 27.653,1.745 33.749,1.745 39.845,1.745 41.369,1.745 44.417,1.745 58.133,1.745 59.657,1.745 -0.541,3.269 4.031,3.269 5.555,3.269 7.079,3.269 11.651,3.269 16.223,3.269 26.891,3.269 32.987,3.269 37.559,3.269 39.083,3.269 40.607,3.269 42.131,3.269 60.758,4.26 63.298,4.26 65.838,4.26 68.378,4.26 -4.351,4.793 4.793,4.793 6.317,4.793 7.841,4.793 16.985,4.793 18.509,4.793 36.797,4.793 38.321,4.793 39.845,4.793 50.513,4.793 52.037,4.793 58.133,4.793 5.801,5.366 1.292,5.485 2.046,5.485 2.8,5.485 3.554,5.485 4.308,5.485 5.062,5.485 6.569,5.485 7.323,5.485 8.077,5.485 8.831,5.485 9.585,5.485 10.339,5.485 59.488,5.53 62.028,5.53 64.568,5.53 39.628,5.779 40.386,5.787 38.891,5.925 38.224,6.278 -3.589,6.317 14.699,6.317 16.223,6.317 17.747,6.317 19.271,6.317 26.891,6.317 36.035,6.317 51.275,6.317 57.371,6.317 1.404,6.639 2.158,6.639 2.912,6.639 3.666,6.639 4.42,6.639 6.933,6.639 7.687,6.639 8.441,6.639 9.195,6.639 9.949,6.639 50.013,6.723 37.672,6.791 40.068,6.975 37.203,7.381 40.495,7.597 -1.303,7.841 0.221,7.841 10.889,7.841 12.413,7.841 16.985,7.841 18.509,7.841 35.273,7.841 36.778,8.041 49.645,8.591 64.568,9.34 -0.541,9.365 11.651,9.365 17.747,9.365 29.939,9.365 32.987,9.365 34.511,9.365 -2.827,10.889 -1.303,10.889 0.221,10.889 1.745,10.889 3.269,10.889 9.365,10.889 10.889,10.889 12.413,10.889 69.648,11.88 -2.065,12.413 -0.541,12.413 0.983,12.413 2.507,12.413 51.275,12.413 57.371,12.413 70.918,13.15 -4.351,13.937 -2.827,13.937 -1.303,13.937 0.221,13.937 1.745,13.937 3.269,13.937 4.793,13.937 6.317,13.937 38.321,13.937 52.037,13.937 58.133,13.937 68.397,14.158 70.918,14.42 -3.589,15.461 -2.065,15.461 -0.541,15.461 0.983,15.461 5.555,15.461 34.511,15.461 36.035,15.461 37.559,15.461 39.083,15.461 40.607,15.461 42.131,15.461 52.799,15.461 69.648,15.69 62.028,16.96 64.568,16.96 69.648,16.96 -4.351,16.985 -2.827,16.985 -1.303,16.985 0.221,16.985 52.037,16.985 53.561,16.985 -2.065,18.509 -0.541,18.509 0.983,18.509 8.603,18.509 10.127,18.509 25.367,18.509 26.891,18.509 40.607,18.509 42.131,18.509 43.655,18.509 48.227,18.509 70.918,19.5 40.263,19.876 26.129,20.033 35.273,20.033 52.037,20.033 53.561,20.033 69.648,20.77 -2.065,21.557 -0.541,21.557 60.758,22.04 65.838,22.04 69.648,22.04 -4.351,23.081 -1.303,23.081 32.225,23.081 33.749,23.081 35.273,23.081 55.085,23.081 67.108,23.31 70.918,23.31 6.172,24.54 62.028,24.58 70.918,24.58 8.603,24.605 16.223,24.605 22.319,24.605 28.415,24.605 32.987,24.605 34.511,24.605 36.035,24.605 49.751,24.605 5.621,25.191 6.721,25.19 70.296,25.592 6.172,25.84 60.758,25.85 65.838,25.85 12.413,26.129 13.937,26.129 15.461,26.129 16.985,26.129 18.509,26.129 33.749,26.129 35.273,26.129 47.465,26.129 50.513,26.129 52.037,26.129 55.085,26.129 67.108,27.12 70.249,27.188 -0.541,27.653 34.511,27.653 62.028,28.39 -4.351,29.177 0.221,29.177 41.369,29.177 42.893,29.177 50.513,29.177 52.037,29.177 53.561,29.177 55.085,29.177 60.758,29.66 70.918,29.66 -0.541,30.701 26.891,30.701 49.751,30.701 51.275,30.701 52.799,30.701 54.323,30.701 62.028,32.2 0.221,32.225 4.793,32.225 26.129,32.225 48.989,32.225 50.513,32.225 52.037,32.225 53.561,32.225 55.085,32.225 60.758,33.47 63.298,33.47 68.378,33.47 70.918,33.47 -0.541,33.749 5.555,33.749 8.603,33.749 25.367,33.749 26.891,33.749 32.987,33.749 51.275,33.749 70.918,34.74 0.221,35.273 3.269,35.273 24.605,35.273 26.129,35.273 27.653,35.273 62.028,36.01 -3.589,36.797 -0.541,36.797 4.031,36.797 5.555,36.797 7.079,36.797 10.127,36.797 11.651,36.797 17.747,36.797 19.271,36.797 20.795,36.797 39.083,36.797 40.607,36.797 42.131,36.797 54.323,36.797 60.758,37.28 65.838,37.28 -2.827,38.321 -1.303,38.321 6.317,38.321 39.845,38.321 41.369,38.321 48.989,38.321 50.513,38.321 55.085,38.321 68.378,38.55 70.918,38.55 27.63,39.685 62.028,39.82 70.918,39.82 -3.589,39.845 -2.065,39.845 2.507,39.845 4.031,39.845 22.319,39.845 23.843,39.845 34.511,39.845 54.323,39.845 40.264,40.014 63.298,41.09 65.838,41.09 -2.827,41.369 15.461,41.369 53.561,41.369 55.085,41.369 56.609,41.369 67.108,42.36 -3.589,42.893 22.319,42.893 70.918,43.63 -2.827,44.417 9.365,44.417 70.918,44.9 32.987,45.941 46.703,45.941 49.751,45.941 51.275,45.941 55.847,45.941 57.371,45.941 59.488,47.44 6.317,47.465 7.841,47.465 9.365,47.465 35.273,47.465 36.797,47.465 38.321,47.465 60.758,48.71 63.298,48.71 68.378,48.71 70.918,48.71 11.651,48.989 29.939,48.989 54.323,48.989 55.847,48.989 60.758,49.98 63.298,49.98 68.378,49.98 70.918,49.98 18.064,50.426 7.841,50.513 9.365,50.513 29.177,50.513 30.701,50.513 58.133,50.513 67.108,51.25 14.699,52.037 17.747,52.037 32.987,52.037 34.511,52.037 36.035,52.037 37.559,52.037 39.083,52.037 40.607,52.037 42.131,52.037 43.655,52.037 45.179,52.037 46.703,52.037 48.227,52.037 49.751,52.037 51.275,52.037 -1.303,53.561 3.269,53.561 71.849,53.561 70.918,53.79 -2.065,55.085 23.843,55.085 66.515,55.085 68.039,55.085 69.563,55.085 71.087,55.085 15.461,56.609 16.985,56.609 29.177,56.609 33.749,56.609 35.273,56.609 41.369,56.609 45.941,56.609 53.561,56.609 58.133,56.609 59.657,56.609 61.181,56.609 62.705,56.609 67.277,56.609 68.801,56.609 70.325,56.609 71.849,56.609 -2.065,58.133 13.175,58.133 14.699,58.133 31.463,58.133 32.987,58.133 34.511,58.133 36.035,58.133 37.559,58.133 39.083,58.133 48.227,58.133 55.847,58.133 57.371,58.133 58.895,58.133 60.419,58.133 61.943,58.133 63.467,58.133 64.991,58.133 66.515,58.133 68.039,58.133 69.563,58.133 71.087,58.133 18.259,58.367 19.013,58.367 19.767,58.367 20.521,58.367 21.275,58.367 23.537,58.367 24.291,58.367 25.045,58.367 25.799,58.367 26.553,58.367 42.809,58.367 43.563,58.367 44.317,58.367 45.071,58.367 45.825,58.367 48.841,58.367 49.595,58.367 50.349,58.367 51.103,58.367 17.979,59.595 18.733,59.595 19.487,59.595 20.241,59.595 20.995,59.595 21.749,59.595 23.25,59.595 24.004,59.595 24.758,59.595 25.512,59.595 26.266,59.595 27.02,59.595 42.529,59.595 43.283,59.595 44.037,59.595 44.791,59.595 45.545,59.595 46.299,59.595 47.8,59.595 48.554,59.595 49.308,59.595 50.062,59.595 50.816,59.595 51.57,59.595 10.889,59.657 12.413,59.657 13.937,59.657 30.701,59.657 32.225,59.657 36.797,59.657 38.321,59.657 55.085,59.657 56.609,59.657 58.133,59.657 59.657,59.657 68.801,59.657 70.325,59.657 71.849,59.657 22.507,59.717 47.052,59.724 16.223,61.181 20.795,61.181 22.319,61.181 23.843,61.181 28.415,61.181 34.511,61.181 36.035,61.181 40.607,61.181 46.703,61.181 48.227,61.181 52.799,61.181 58.895,61.181 60.419,61.181 69.563,61.181 71.087,61.181 15.461,62.705 16.985,62.705 21.557,62.705 23.081,62.705 27.653,62.705 29.177,62.705 33.749,62.705 35.273,62.705 36.797,62.705 39.845,62.705 41.369,62.705 45.941,62.705 47.465,62.705 48.989,62.705 52.037,62.705 53.561,62.705 58.133,62.705 59.657,62.705 61.181,62.705 64.229,62.705 65.753,62.705 67.277,62.705 68.801,62.705 70.325,62.705 71.849,62.705
  other v4: 20.599,-3.396 20.207,-2.938 19.786,-2.217 19.118,-2.054 18.726,-1.596 19.777,-1.581 20.395,-1.227 20.395,-0.627 20.395,-0.027 20.242,0.569 20.842,0.569 21.442,0.569 19.642,1.169 20.242,1.169 20.842,1.169 21.442,1.169 19.042,1.769 19.642,1.769 20.242,1.769 20.842,1.769 21.442,1.769 19.042,2.369 19.642,2.369 19.042,2.969 19.642,2.969 -0.461,4.809 11.814,4.809 -1.347,5.176 0.424,5.176 10.928,5.176 12.699,5.176 44.005,5.566 44.605,5.566 45.205,5.566 45.805,5.566 46.862,5.631 -1.714,6.062 13.066,6.062 44.005,6.166 44.605,6.166 45.205,6.166 45.805,6.166 -1.347,6.948 0.424,6.948 10.928,6.948 12.699,6.948 -0.461,7.315 11.814,7.315 4.552,7.342 6.8,7.342 44.004,7.757 44.604,7.757 45.204,7.757 45.804,7.757 46.404,7.757 37.618,9.439 38.218,9.439 38.818,9.439 37.618,10.039 38.218,10.039 38.818,10.039 37.618,10.639 38.218,10.639 48.813,11.06 48.42,11.518 44.128,12.307 44.728,12.307 45.328,12.307 44.128,12.907 44.728,12.907 45.328,12.907 44.128,13.507 44.728,13.507 44.244,15.879 45.212,15.879 37.618,20.026 38.218,20.026 38.818,20.026 37.618,20.626 38.218,20.626 38.818,20.626 37.618,21.226 38.218,21.226 38.818,21.226 50.943,21.547 51.401,21.94 44.128,22.897 44.728,22.897 45.328,22.897 44.128,23.497 44.728,23.497 45.328,23.497 44.128,24.097 44.728,24.097 5.509,24.431 6.835,24.431 5.509,25.949 6.835,25.949 44.244,26.469 45.212,26.469 6.698,28.06 45.081,28.82 44.688,29.278 37.034,29.572 39.401,29.572 37.618,31.34 38.218,31.34 38.818,31.34 37.618,31.94 38.218,31.94 38.818,31.94 37.618,32.54 38.218,32.54 44.128,34.211 44.728,34.211 45.328,34.211 44.128,34.811 44.728,34.811 45.328,34.811 44.128,35.411 44.728,35.411 44.244,37.783 45.212,37.783 37.619,40.166 38.219,40.166 38.819,40.166 1.812,40.596 2.412,40.596 3.012,40.596 3.612,40.596 25.809,40.687 37.619,40.766 38.219,40.766 38.819,40.766 1.812,41.196 2.412,41.196 3.012,41.196 3.612,41.196 37.619,41.366 38.219,41.366 38.819,41.366 5.123,41.501 3.012,41.796 51.405,41.899 18.033,42.03 2.161,42.141 30.51,42.149 51.863,42.291 3.012,42.396 1.812,42.996 2.412,42.996 3.012,42.996 23.108,43.03 24.308,43.03 25.066,43.022 25.808,43.03 27.05,43.03 44.129,43.034 44.729,43.034 45.329,43.034 21.295,43.217 1.812,43.596 2.412,43.596 3.012,43.596 23.108,43.63 23.708,43.63 24.308,43.63 25.066,43.622 44.129,43.634 44.729,43.634 45.329,43.634 25.797,43.791 30.518,43.784 21.891,43.813 26.558,44.05 22.958,44.23 23.558,44.23 24.158,44.23 24.758,44.23 25.358,44.23 44.129,44.234 44.729,44.234 21.294,44.41 22.958,44.83 23.558,44.83 24.158,44.83 24.758,44.83 25.358,44.83 25.958,44.83 26.558,44.83 21.89,45.007 1.808,45.072 2.408,45.072 3.008,45.072 22.958,45.43 23.558,45.43 24.158,45.43 24.758,45.43 25.358,45.43 29.039,45.531 30.104,45.539 21.293,45.604 1.808,45.672 2.408,45.672 3.008,45.672 26.558,45.78 22.958,46.03 23.558,46.03 24.158,46.03 24.758,46.03 25.358,46.03 21.89,46.201 1.808,46.272 2.408,46.272 3.008,46.272 44.246,46.606 45.213,46.606 22.958,46.63 23.558,46.63 24.158,46.63 24.758,46.63 25.358,46.63 25.958,46.63 26.558,46.63 21.292,46.798 68.696,46.808 22.958,47.23 23.558,47.23 24.158,47.23 24.758,47.23 25.358,47.23 25.958,47.23 26.558,47.23 21.889,47.395 30.104,47.522 22.958,47.83 23.558,47.83 24.158,47.83 24.758,47.83 25.358,47.83 25.958,47.83 27.164,47.819 -1.001,47.883 0.199,47.883 21.292,47.992 1.978,48.056 25.683,48.567 22.485,48.588 24.273,48.586 24.873,48.586 26.443,48.577 -0.985,48.696 21.808,49.03 23.308,49.03 -1.276,50.006 55.734,50.805 55.342,51.263 -0.135,51.371 31.104,51.679 68.818,51.885 70.599,51.888 -0.355,51.963 23.935,51.979 30.712,52.137 21.859,52.297 -0.155,52.998 -0.805,53.075 18.411,53.153 20.55,53.155 7.501,53.849 8.101,53.849 5.877,54.227 9.016,54.733 6.276,54.939 6.901,55.049 5.884,55.397 6.901,55.649 5.701,56.249 6.301,56.249 6.901,56.249 5.701,56.849 6.301,56.849 6.901,56.849 5.701,57.449 6.301,57.449 6.901,57.449 16.37,57.729 28.645,57.729 40.92,57.729 53.195,57.729 6.301,58.049 6.901,58.049 15.484,58.095 17.255,58.095 27.759,58.095 29.53,58.095 40.034,58.095 41.805,58.095 52.309,58.095 54.08,58.095 6.301,58.649 6.901,58.649 15.117,58.981 29.897,58.981 39.667,58.981 54.447,58.981 6.901,59.249 15.484,59.867 17.255,59.867 27.759,59.867 29.53,59.867 40.034,59.867 41.805,59.867 52.309,59.867 54.08,59.867 16.37,60.234 28.645,60.234 40.92,60.234 53.195,60.234
  other v5: 4.921,7.876 6.431,7.876 6.926,8.396 50.589,9.021 51.343,9.021 52.097,9.021 53.605,9.021 57.375,9.021 58.129,9.021 58.883,9.021 59.637,9.021 60.391,9.021 61.145,9.021 61.898,9.059 5.108,9.303 41.636,10.457 46.321,10.457 47.829,10.457 49.337,10.457 51.599,10.457 52.353,10.457 53.107,10.457 57.631,10.457 58.385,10.457 59.139,10.457 59.893,10.457 60.647,10.457 61.401,10.457 62.124,10.671 7.665,11.003 32.703,11.089 33.457,11.089 34.211,11.089 36.473,11.089 30.446,11.176 40.002,11.332 29.777,11.523 44.962,11.725 7.709,11.756 39.242,11.87 47.483,11.9 62.682,12.01 29.283,12.093 46.867,12.335 8.129,12.382 31.592,12.525 35.362,12.525 38.378,12.525 6.458,12.533 30.839,12.56 42.978,12.577 8.846,12.617 9.6,12.617 10.354,12.617 11.108,12.617 11.862,12.617 12.616,12.617 13.37,12.617 14.124,12.617 15.632,12.617 18.648,12.617 20.156,12.617 23.172,12.621 29.035,12.805 23.89,12.851 6.87,13.165 30.448,13.204 42.995,13.233 47.389,13.384 29.012,13.559 7.44,13.658 47.985,13.845 8.132,13.957 30.448,13.958 8.88,14.052 9.621,14.052 10.375,14.052 11.129,14.052 14.145,14.052 14.899,14.052 16.407,14.052 17.915,14.052 20.177,14.052 27.725,14.092 28.479,14.092 62.682,14.272 42.676,14.479 48.285,14.548 30.259,14.688 46.4,15.01 43.118,15.089 29.753,15.247 48.296,15.302 29.046,15.512 26.03,15.528 46.835,15.626 48.289,16.056 46.71,16.37 48.099,16.792 65.841,17.213 62.863,17.268 71.116,17.28 47.178,17.975 45.132,17.99 46.645,18.508 44.599,18.523 68.344,18.648 69.098,18.648 44.066,19.056 70.942,20.833 44.292,21.361 70.942,21.587 40.867,22.255 44.99,22.316 70.942,22.341 46.867,22.925 43.026,23.176 41.872,23.281 39.801,23.322 42.968,23.829 48.095,24.005 48.733,24.406 49.183,25.012 47.123,25.3 47.833,25.552 46.419,25.571 37.135,25.987 38.673,26.48 36.602,26.521 36.069,27.054 35.536,27.587 70.942,27.619 37.073,28.08 35.002,28.12 70.634,28.307 33.743,28.45 47.96,28.558 36.54,28.613 34.469,28.653 49.395,28.754 36.007,29.146 47.96,29.312 49.393,29.508 35.474,29.679 44.274,29.74 47.718,30.026 42.959,30.046 49.244,30.247 32.002,30.743 48.861,30.897 31.619,31.393 47.602,31.688 41.573,31.752 42.327,31.752 43.081,31.752 44.589,31.752 45.343,31.752 46.851,31.752 40.819,31.763 40.179,32.162 45.519,32.424 44.272,32.737 42.932,33.047 38.627,33.423 44.307,33.488 42.448,33.625 45.049,33.623 40.062,33.661 47.483,33.804 46.867,34.239 30.02,34.552 29.49,35.088 42.928,35.159 47.658,35.178 52.181,35.225 28.956,35.622 38.163,35.619 30.893,35.715 33.647,35.716 28.423,36.155 30.36,36.248 33.33,36.4 42.728,36.43 46.98,36.614 47.734,36.614 49.242,36.614 50.75,36.614 27.89,36.688 29.827,36.782 46.332,36.999 53.337,36.991 43.167,37.043 51.85,37.284 29.294,37.315 53.337,37.745 31.895,38.433 53.337,38.499 33.33,38.662 51.85,38.792 31.895,39.187 49.412,39.233 33.33,39.416 48.148,39.446 51.85,39.546 43.047,39.932 43.801,39.932 44.555,39.932 45.309,39.932 46.817,39.932 50.448,39.932 31.895,39.941 53.316,40.007 42.319,40.127 33.33,40.17 41.741,40.611 52.985,40.707 49.417,41.367 50.171,41.367 31.895,41.449 33.33,41.678 42.795,41.971 45.514,42.21 44.792,42.427 47.484,42.627 46.868,43.062 32.925,43.1 42.795,43.24 41.359,43.548 31.605,43.813 32.359,43.813 33.113,43.813 42.927,43.983 47.674,44.001 48.428,44.001 42.396,44.832 41.742,45.206 31.187,45.248 31.941,45.248 32.695,45.248 33.449,45.248 34.203,45.248 34.957,45.248 35.711,45.248 36.465,45.248 37.219,45.248 37.973,45.248 38.727,45.248 40.989,45.248 42.938,45.356 47.313,45.437 48.067,45.437 50.329,45.437 51.837,45.437 30.874,45.81 31.61,45.974 43.344,45.992 46.07,46.01 52.119,46.136 32.235,46.396 32.641,47.031 30.68,47.244 31.311,47.58 32.788,47.771 31.348,48.333 32.784,48.525 53.587,48.632 47.386,48.707 31.356,49.087 33.205,49.151 34.713,49.151 35.467,49.151 36.221,49.151 36.975,49.151 37.729,49.151 38.483,49.151 39.237,49.151 39.991,49.151 40.745,49.151 41.499,49.151 53.407,49.37 52.998,50.003 32.117,50.341 32.833,50.577 33.587,50.587 34.341,50.587 35.095,50.587 35.849,50.587 36.603,50.587 37.357,50.587 38.111,50.587 38.865,50.587 39.619,50.587 40.373,50.587 41.127,50.587 41.881,50.587 42.635,50.587 43.389,50.587 44.143,50.587 44.897,50.587 45.651,50.587 46.405,50.587 47.913,50.587 48.667,50.587 50.175,50.587 51.637,50.588
GT_REFCLK_AUX_N: C68.1 J4.B21 | length 93.7
  Top Layer w0.099: C68.1@5.499,6.71 v3@5.499,7.137
  Clocks w0.114: v3(5.374,7.262) 5.524,7.411 5.524,8.031 cw(c6.485,8.031) 5.806,8.711 6.598,9.503 ccw(c6.123,9.978) 6.795,9.978 6.795,11.439 cw(c8.843,11.439) 8.843,13.487 22.684,13.487 ccw(c22.684,14.405) 23.333,13.756 24.215,14.637 cw(c25,13.851) 25,14.962 28.825,14.962 cw(c28.825,13.905) 29.882,13.905 29.882,13.121 ccw(c31.044,13.121) 31.044,11.959 37.528,11.959 cw(c37.528,10.634) 38.465,11.571 39.812,10.225 ccw(c40.616,11.029) 40.616,9.892 54.766,9.892 54.823,9.892 ccw(c54.823,10.076) 55.007,10.076 55.007,10.092 cw(c55.191,10.092) 55.375,10.092 55.375,10.076 ccw(c55.559,10.076) 55.559,9.892 55.817,9.892 61.398,9.892 ccw(c61.398,11.742) 63.248,11.742 63.248,16.355 cw(c64.976,16.355) 64.976,18.083 70.609,18.083 ccw(c70.609,18.981) 71.507,18.981 71.507,28.035 ccw(c70.67,28.035) 70.67,28.873 70.13,28.873 ccw(c70.13,28.39) v3(69.648,28.39) ; v3@5.448,7.309 v3@5.495,7.262
GT_REFCLK_AUX_P: C67.1 J4.B20 | length 93.7
  Top Layer w0.099: C67.1@5.853,6.71 v3@5.853,7.137
  Clocks w0.114: v3@5.857,7.262 v3@5.904,7.309 ; v3(5.978,7.262) 5.828,7.411 5.828,8.031 cw(c6.485,8.031) 6.021,8.495 6.814,9.288 ccw(c6.123,9.978) 7.1,9.978 7.1,11.439 cw(c8.843,11.439) 8.843,13.182 22.685,13.182 ccw(c22.685,14.402) 23.548,13.539 24.43,14.422 cw(c25,13.851) 25,14.658 28.825,14.658 cw(c28.825,13.905) 29.577,13.905 29.577,13.121 ccw(c31.044,13.121) 31.044,11.655 37.528,11.655 cw(c37.528,10.634) 38.25,11.356 39.596,10.009 ccw(c40.616,11.029) 40.616,9.587 61.398,9.587 ccw(c61.398,11.742) 63.553,11.742 63.553,16.355 cw(c64.976,16.355) 64.976,17.778 70.609,17.778 ccw(c70.609,18.981) 71.812,18.981 71.812,28.035 ccw(c70.67,28.035) 70.67,29.177 70.13,29.177 cw(c70.13,29.66) v3(69.648,29.66)
IN0_N: C79.1 IC9.64 R52.1 | length 2.2
  Top Layer w0.099: C79.1@19.228,52.525 19.228,52.484 19.325,52.386 19.325,52.309 19.325,52.307 ccw(c19.825,52.309) 19.412,52.027 19.439,51.988 19.829,51.598 cw(c19.644,51.412) 19.906,51.412 19.906,51.335 R52.1@19.783,51.212 19.906,51.09 19.906,50.681 IC9.64@19.881,50.656
IN0_P: C77.1 IC9.63 R52.2 | length 2.2
  Top Layer w0.099: C77.1@19.727,52.525 19.727,52.484 19.63,52.386 19.63,52.309 ccw(c19.825,52.309) 19.687,52.171 20.074,51.784 20.099,51.75 cw(c19.644,51.412) 20.211,51.412 20.211,51.335 R52.2@20.333,51.212 20.211,51.09 20.211,50.681 IC9.63@20.236,50.656